# EAGLE board ex1-brd (EAGLE 9.6.2)
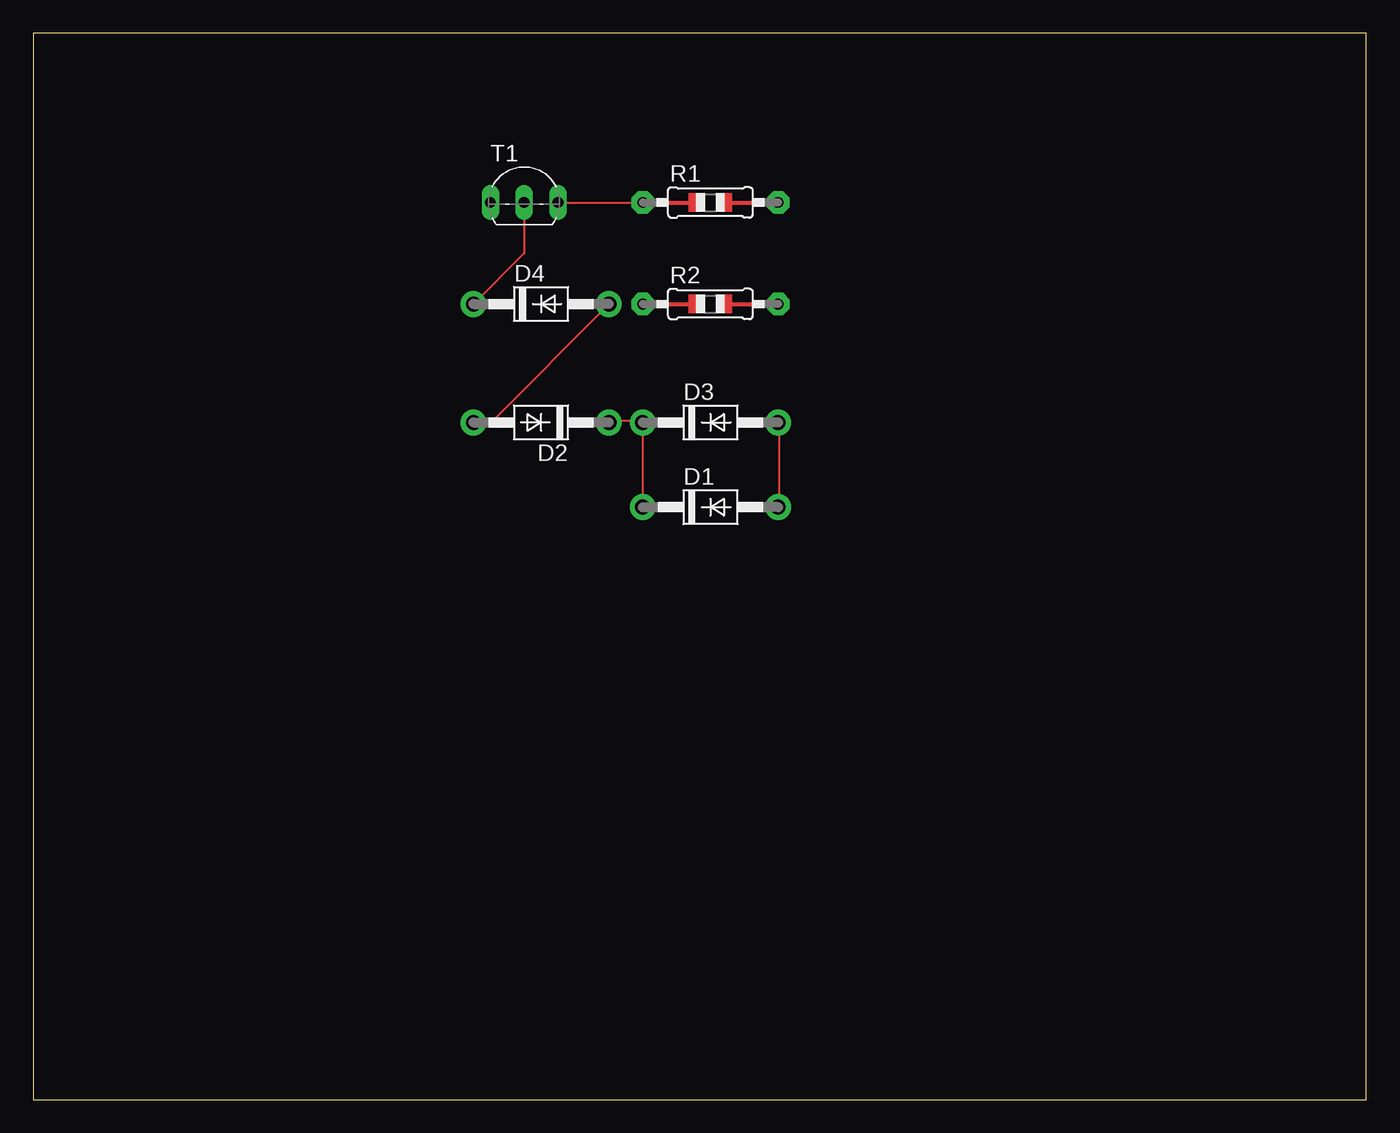
[diagram p0: board, top side]
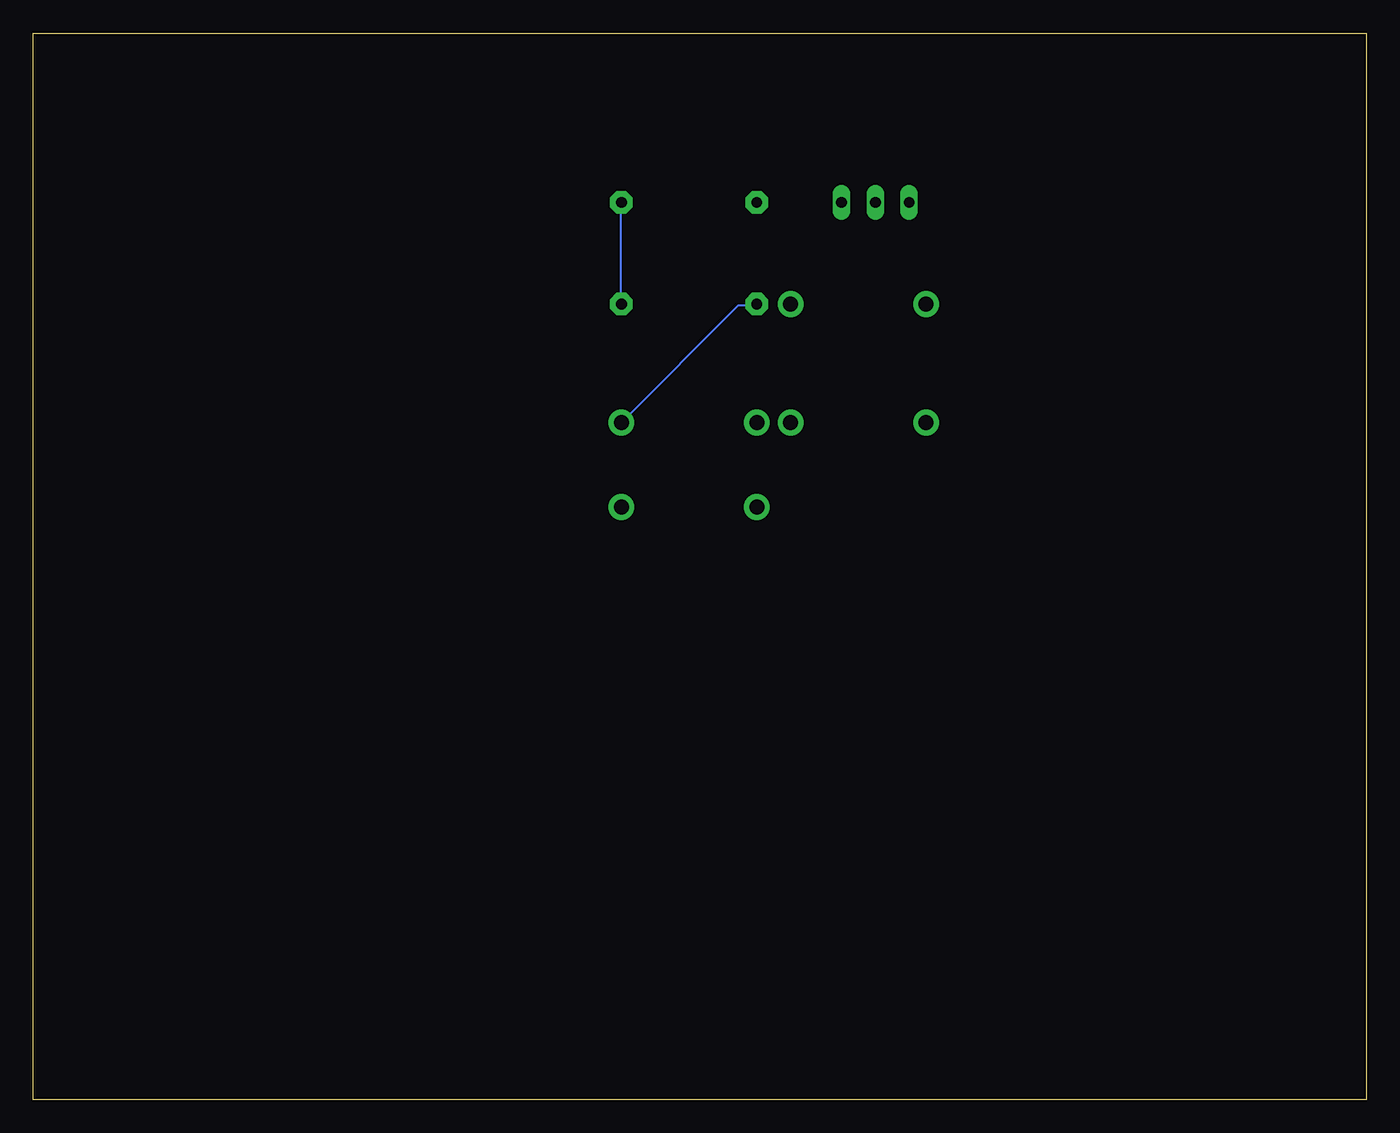
[diagram p1: board, bottom side, seen from below]

Size 100 x 80 mm. Coordinates in mm from the lower left corner, seen from the top.
Outline: 0,0 100,0 100,80 0,80 0,0
Copper layers (1*16): Top 0.035mm / dielectric 1.5mm / Bottom 0.035mm
Design rules "default": minimum track width 6mil, minimum drill 0.35mm, track to track 6mil, track to pad 6mil, pad to pad 6mil, via to via 6mil, smd to smd 6mil, copper to edge 40mil, drill to drill 6mil, minimum pad ring 10mil, minimum via ring 8mil, stop-mask expansion 4mil, vias tented up to drill 0mil, thermal gap 10mil

## Footprints (pad centres in the part's own frame; a part is rotated, then mirrored left to right if it is on the bottom)
DO41-10 = drill 1.118 pad 1.93: A 5.08,0; C -5.08,0
0805-THM = drill 0.813 pad 1.676 octagon: 1 -5.08,0; 2 5.08,0
TO92-EBC-OVAL = drill 0.813 long: B 0,-1.27; C 2.54,-1.27; E -2.54,-1.27

## Placement (x,y rotation side)
D1  1N4004  [DO41-10]  50.8,44.45 0 top
D2  1N4004  [DO41-10]  38.1,50.8 180 top
D3  1N4004  [DO41-10]  50.8,50.8 0 top
D4  1N4004  [DO41-10]  38.1,59.69 0 top
R1  1k  [0805-THM]  50.8,67.31 0 top
R2  4.7k  [0805-THM]  50.8,59.69 0 top
T1  2N2222  [TO92-EBC-OVAL]  36.83,68.58 0 top

## Library data of the parts
D1-D4 R1 R2 T1 = adafruit

## Nets
0: T1.E
N$1: D4.C T1.B
N$2: D1.A D3.A R2.1
N$3: D2.A D4.A
N$4: R1.1 T1.C
N$5: D1.C D2.C D3.C
VCC: R1.2 R2.2

## Tracks (layer width: path | path; a pad name or v marks a point on that pad's centre or on a via)
N$1
  Top 0.152: T1.B 36.83,63.5 D4.C
N$2
  Top 0.152: D1.A 55.93,44.5 55.93,50.75 D3.A
  Bottom 0.152: D3.A 47.09,59.59 45.72,59.59 R2.1
N$3
  Top 0.152: D2.A 33.07,50.9 34.44,50.9 43.13,59.59 D4.A
N$4
  Top 0.152: T1.C R1.1
N$5
  Top 0.152: D2.C 43.28,50.9 45.72,50.9 D3.C D1.C
VCC
  Bottom 0.152: R2.2 55.93,59.74 55.93,67.21 R1.2